# Altium PCB updated_pcb_file.PcbDoc (part 5 of 5)
Units mil, origin at the board's own origin, x right, y up, seen from the top; angles counter-clockwise.
Board outline 3385.83 x 2125.98 mil, 4 copper layers (L1 (TOP), L2 (GND), L3 (PWR), L4 (BOTTOM)), stack 38.228 mil thick; 154 components, 143 nets, 726 pads, 326 vias.
Unrouted connection lines stored in the file: 46.
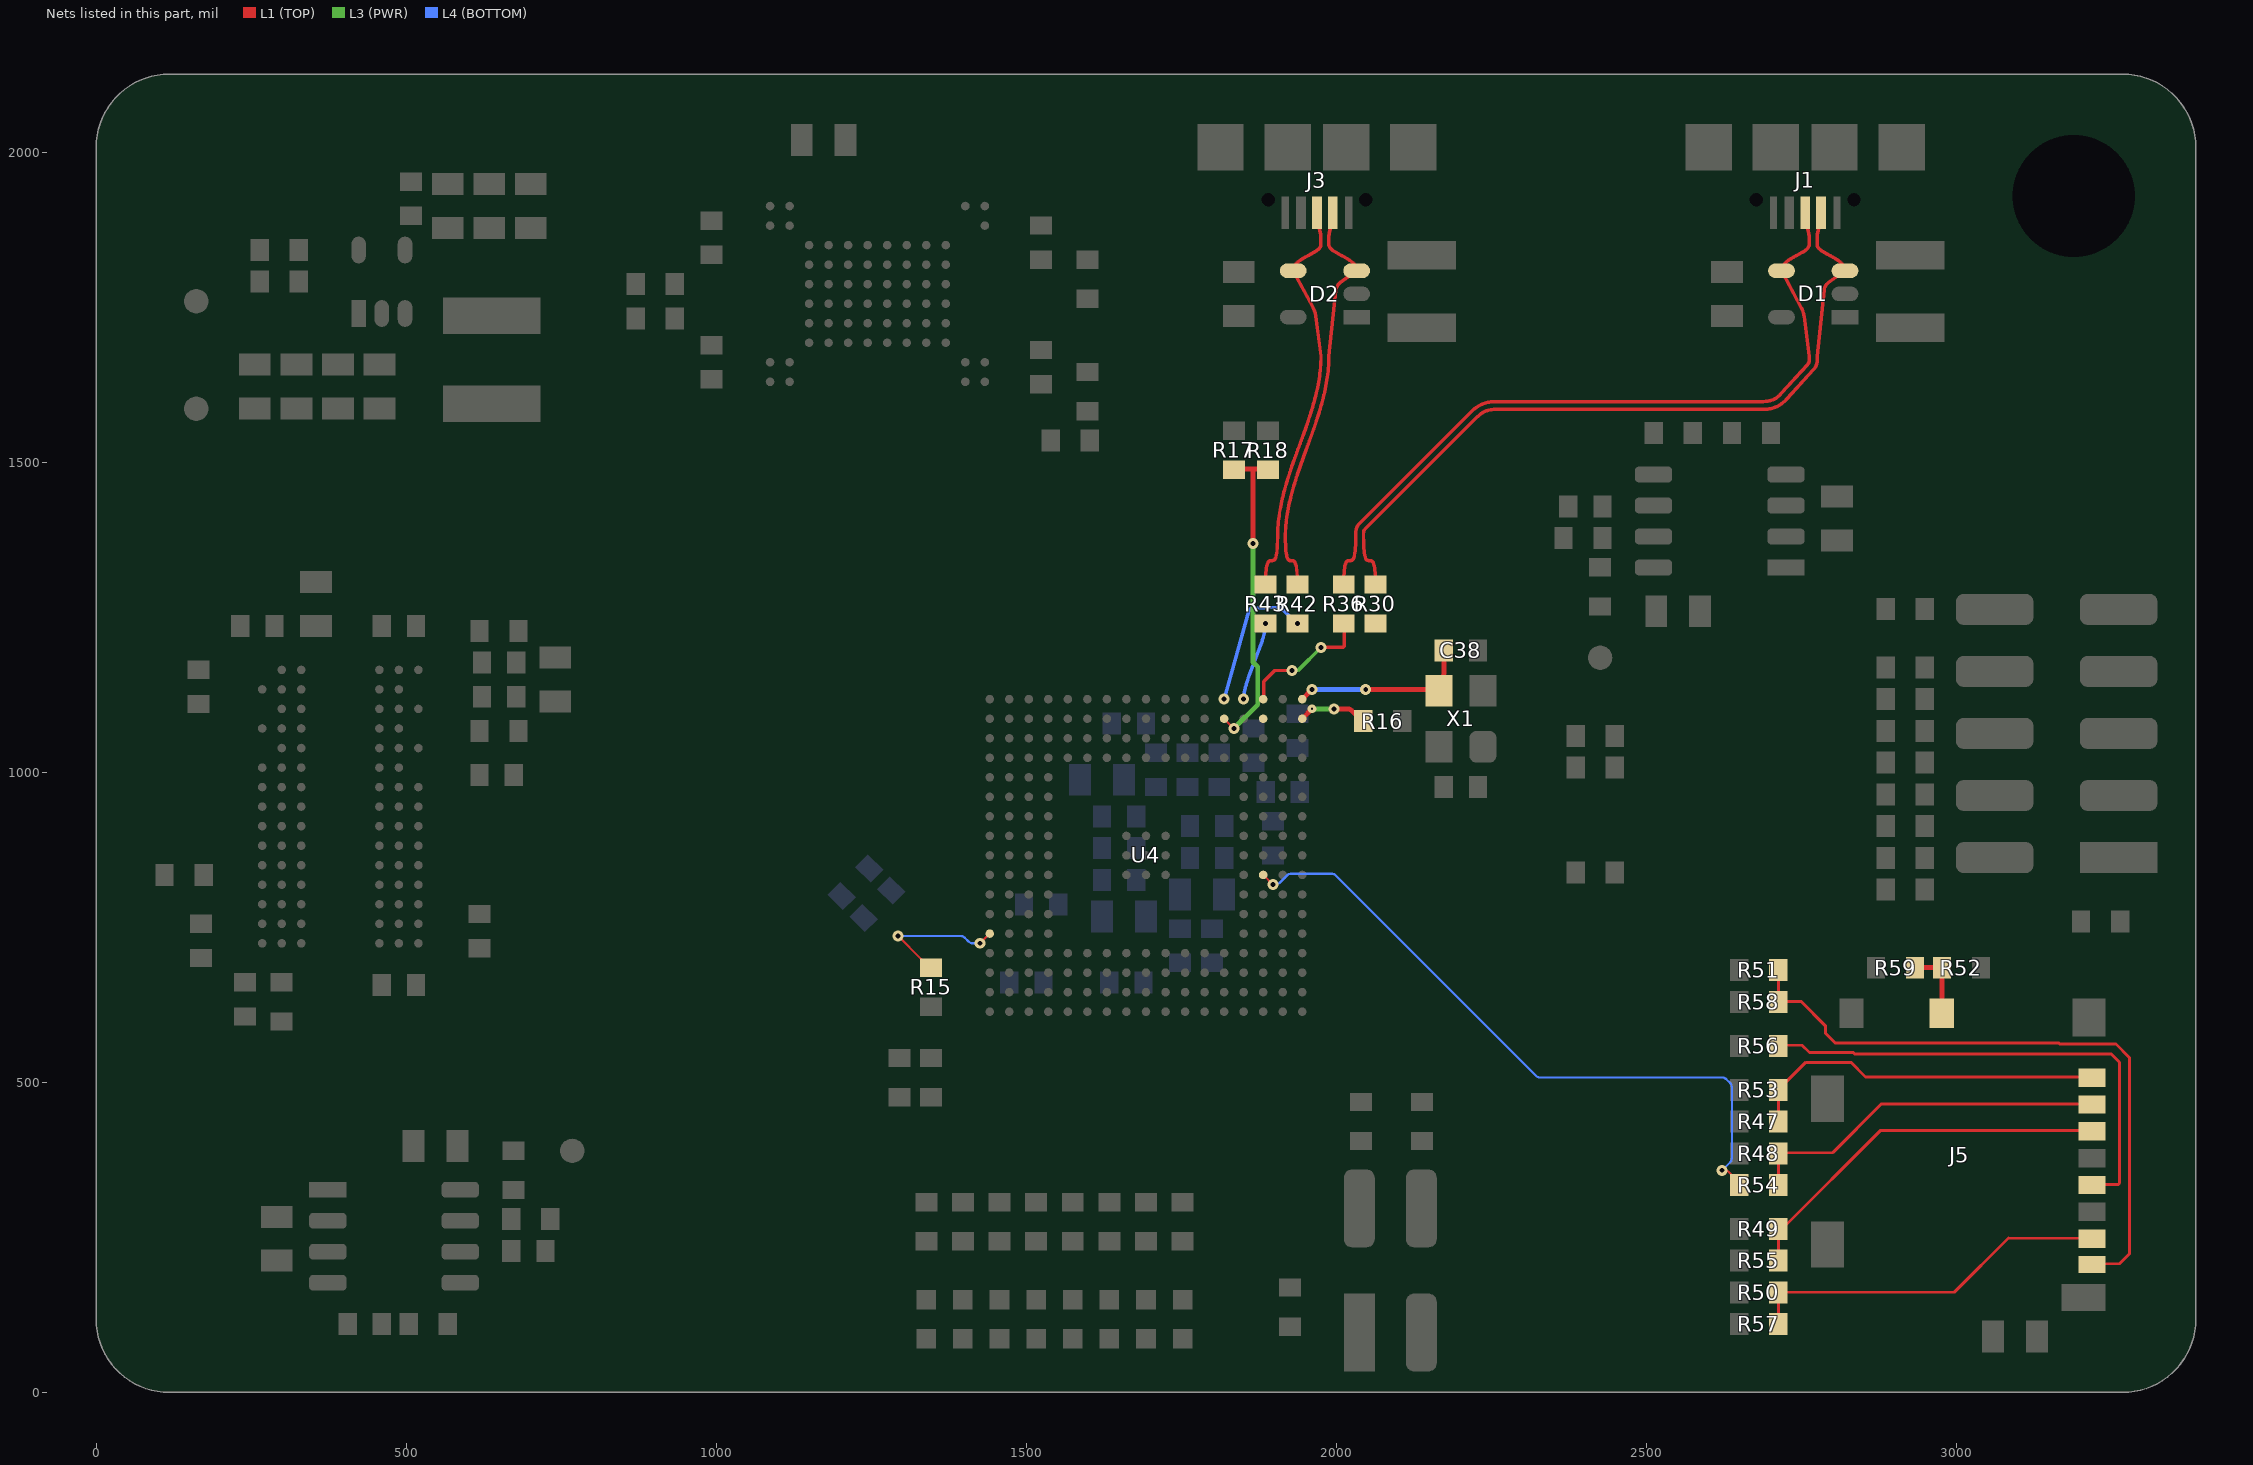
[diagram p7: the nets of this part, all layers, seen from the top]

## Via types
v1: diameter 17.72, hole 7.87, L1 (TOP) to L4 (BOTTOM), 310 vias
v2: diameter 13.78, hole 3.94, L1 (TOP) to L3 (PWR), 7 vias
v3: diameter 17.72, hole 7.87, L1 (TOP) to L3 (PWR), 5 vias
v4: diameter 13.78, hole 3.94, L2 (GND) to L4 (BOTTOM), 3 vias
v5: diameter 13.78, hole 3.94, L3 (PWR) to L4 (BOTTOM), 1 vias

## Nets (pads, with @x,y where several pads share a name; then routed paths per layer and width w, separated by ;. In a path a pad name is that pad's centre, name@x,y a point inside that pad or via, vN(x,y) a via of type N, cw(c..) or ccw(c..) an arc to the next point about the centre after c; other vN are vias at no path point) (continued)
SD_DAT3: R54.2 U4.R8 | length 1090.5
  L1 (TOP) w3.54: U4.R8@1881.89,834.65 v1(1897.64,818.9) ; v1(2622.05,358.27) 2625.98,358.27 cw(c2625.98,348.76) 2632.7,355.48 2635.83,352.36 R54.2@2649.6,334.65
  L4 (BOTTOM) w3.54: v1(1897.64,818.9) 1901.57,818.9 ccw(c1901.57,828.4) 1908.3,821.68 1920.35,833.73 cw(c1927.3,826.77) 1927.3,836.61 1991.99,836.61 cw(c1991.99,826.77) 1998.95,833.73 2321.92,510.76 ccw(c2328.88,517.72) 2328.88,507.87 2621.91,507.87 cw(c2621.91,498.03) 2628.87,504.99 2634.91,498.95 cw(c2627.95,491.99) 2637.79,491.99 2637.79,378.09 cw(c2627.95,378.09) 2634.91,371.13 v1(2622.05,358.27)
SD_R_CD: J5.9 R52.1 R59.1 | length 116.7
  L1 (TOP) w7.87: R59.1@2933.07,685.04 2976.38,685.04 J5.9@2976.28,611.61
SD_R_CLK: J5.5 R56.1 | length 802
  L1 (TOP) w4.72: R56.1@2712.6,559.06 2715.59,559.9 2751.03,559.9 2762.84,548.09 2833.7,548.09 2835.67,546.12 3249.06,546.12 3262.84,532.34 3262.84,337.46 3260.87,335.49 3221.5,335.49 J5.5@3218.41,334.65
SD_R_CMD: J5.3 R49.1 R55.1 | length 622.6
  L1 (TOP) w4.72: R55.1@2712.6,212.6 2712.6,263.78 2719.53,264.62 2877.01,422.1 3217.56,422.1 J5.3@3218.41,421.26
SD_R_DAT0: J5.7 R50.1 R57.1 | length 592.9
  L1 (TOP) w4.72: R57.1@2712.6,110.24 2712.6,161.42 2997.09,162.26 3083.7,248.87 J5.7@3218.41,248.03
SD_R_DAT1: J5.8 R51.1 R58.1 | length 1045.5
  L1 (TOP) w4.72: R51.1@2712.6,681.1 2712.6,629.92 2715.59,630.76 2749.06,630.76 2788.43,591.39 2788.43,579.58 2804.18,563.83 3164.41,563.83 3166.38,561.87 3256.93,561.87 3278.59,540.21 3278.59,223.28 3262.84,207.54 3221.5,207.54 J5.8@3218.41,206.69
SD_R_DAT2: J5.1 R47.1 R53.1 | length 585.4
  L1 (TOP) w4.72: R47.1@2712.6,437.01 2712.6,488.19 2756.93,532.34 2829.77,532.34 2853.39,508.72 3217.56,508.72 J5.1@3218.41,507.87
SD_R_DAT3: J5.2 R48.1 R54.1 | length 590
  L1 (TOP) w4.72: R54.1@2712.6,334.65 2712.6,385.83 2800.24,386.67 2878.98,465.41 3217.56,465.41 J5.2@3218.41,464.57
USB_D_N: D1.3 J1.2 R30.1 | length 1219.9
  L1 (TOP) w5.55: 2049.71,1342.13 cw(c2051.87,1345.91) 2048.91,1342.72 2048.86,1342.77 cw(c2052.63,1346.83) 2048.11,1343.62 2047.65,1344.26 2046.91,1345.78 2046.22,1347.76 2045.61,1350.26 2045.06,1353.34 2044.6,1357.08 2044.23,1361.52 2043.95,1366.74 2043.78,1372.79 2043.72,1379.73 2043.72,1383.94 2043.72,1385.9 2043.77,1387.49 2043.88,1388.13 cw(c2049.48,1387.26) 2044.13,1389.13 2044.3,1389.62 2044.83,1390.58 2045.61,1391.59 2046.78,1392.81 2048.2,1394.24 2226.49,1572.53 2227.86,1573.86 2229.32,1575.15 2230.81,1576.48 2232.11,1577.56 2233.6,1578.57 2235.19,1579.65 2236.62,1580.51 2238.28,1581.33 2239.92,1582.15 2241.46,1582.76 2243.31,1583.37 2244.95,1583.94 2246.59,1584.27 2248.58,1584.65 2250.25,1584.98 2251.95,1585.07 2254.03,1585.2 2255.94,1585.31 2257.86,1585.31 2686.56,1585.31 2688.8,1585.31 2691.1,1585.4 2693.26,1585.54 2695.67,1585.7 2698.16,1586.1 2700.34,1586.54 2702.8,1587.05 2705.22,1587.87 2707.31,1588.61 2709.7,1589.54 2711.9,1590.71 2713.92,1591.79 2716.09,1593.12 2718.01,1594.52 2719.9,1595.92 2721.81,1597.58 2723.45,1599.16 2725.05,1600.72 2726.63,1602.39 2769.08,1649.21 2770.7,1651.12 2772.34,1653.47 2773.7,1656.18 2774.64,1659.12 2775.1,1662.04 2775.22,1664.63 2775.22,1666.85 2775.22,1671.06 2786.49,1777.79 cw(c2796.28,1776.75) 2786.84,1779.54 2787.11,1780.45 2787.68,1782.19 2788.46,1783.82 2789.37,1785.36 2790.4,1786.85 2791.63,1788.2 2792.29,1788.89 cw(c2799.39,1782.07) 2793.64,1790.06 2820.08,1809.06 2819.94,1811.05 2819.54,1812.95 2818.9,1814.77 2818.03,1816.51 2816.95,1818.18 2815.68,1819.79 2814.24,1821.32 2812.65,1822.8 2810.92,1824.22 2809.07,1825.6 2807.12,1826.93 2805.1,1828.21 2803,1829.47 2800.87,1830.69 2798.7,1831.88 2796.53,1833.05 2794.36,1834.2 2792.23,1835.35 2790.13,1836.48 2788.1,1837.61 2786.16,1838.74 2784.31,1839.88 2782.58,1841.03 2780.98,1842.19 2779.54,1843.37 2778.27,1844.58 2777.19,1845.81 2776.32,1847.08 2775.67,1848.39 2775.47,1849.07 cw(c2782.57,1851.18) 2775.2,1850.45 2775.13,1851.15 2775.11,1860.5 2775.13,1861.9 2775.18,1863.25 2775.27,1864.56 2775.39,1865.83 2775.54,1867.06 2775.72,1868.27 2775.93,1869.45 2776.15,1870.61 2776.4,1871.76 2776.66,1872.89 2776.94,1874.02 2777.23,1875.15 2777.52,1876.28 2778.14,1878.58 2778.45,1879.75 2778.75,1880.94 2779.06,1882.16 2779.36,1883.41 2779.65,1884.7 2779.92,1886.02 2780.19,1887.4 2780.44,1888.82 2780.66,1890.3 2780.87,1891.83 2781.05,1893.43 2781.2,1895.1 2781.33,1896.84 2781.42,1898.67 2781.48,1900.57 J1.2@2781.5,1902.56 ; 2049.74,1342.11 ccw(c2051.89,1345.89) 2050.6,1341.74 2051.05,1341.6 2051.96,1341.48 2052.89,1341.44 2053.82,1341.44 2054.75,1341.41 2055.67,1341.28 2056.12,1341.14 cw(c2054.82,1336.99) 2056.97,1340.77 cw(c2054.84,1336.97) 2057.8,1340.16 2057.85,1340.12 cw(c2054.09,1336.05) 2058.6,1339.27 2059.06,1338.62 2059.8,1337.1 2060.49,1335.13 2061.11,1332.63 2061.65,1329.54 2062.11,1325.8 2062.49,1321.36 2062.76,1316.14 2062.93,1310.09 R30.1@2062.99,1303.15
USB_D_P: D1.4 J1.3 R36.1 | length 1212.7
  L1 (TOP) w5.55: R36.1@2011.81,1303.15 2011.87,1310.09 2012.04,1316.14 2012.32,1321.36 2012.69,1325.8 2013.15,1329.54 2013.7,1332.63 2014.32,1335.13 2015,1337.1 2015.74,1338.62 2016.2,1339.27 cw(c2020.72,1336.05) 2016.95,1340.12 2017,1340.16 cw(c2019.96,1336.97) 2017.8,1340.75 ; 2017.83,1340.77 cw(c2019.98,1336.99) 2018.69,1341.14 2019.14,1341.28 2020.05,1341.41 2020.98,1341.44 2021.91,1341.44 2022.84,1341.48 2023.76,1341.6 2024.21,1341.74 ccw(c2022.91,1345.89) 2025.06,1342.11 ; 2025.09,1342.13 ccw(c2022.93,1345.91) 2025.89,1342.72 2025.94,1342.77 ccw(c2022.18,1346.83) 2026.69,1343.62 2027.15,1344.26 2027.9,1345.78 2028.58,1347.76 2029.2,1350.26 2029.74,1353.34 2030.2,1357.08 2030.58,1361.52 2030.85,1366.74 2031.02,1372.79 2031.08,1379.73 2031.08,1383.94 2031.08,1386.17 2031.2,1388.79 2031.71,1391.77 2032.75,1394.75 2034.23,1397.47 2036,1399.79 2037.72,1401.63 2039.27,1403.17 2217.61,1581.51 2219.25,1583.11 2220.94,1584.61 2222.59,1586.07 2224.52,1587.67 2226.5,1589.02 2228.39,1590.3 2230.55,1591.6 2232.66,1592.65 2234.79,1593.7 2237.14,1594.63 2239.28,1595.35 2241.62,1596.13 2244.09,1596.66 2246.22,1597.07 2248.69,1597.52 2251.19,1597.69 2253.3,1597.81 2255.59,1597.94 2257.86,1597.94 2686.56,1597.94 2688.53,1597.94 2690.43,1598.02 2692.46,1598.15 2694.25,1598.26 2695.89,1598.53 2697.84,1598.93 2699.49,1599.25 2701.04,1599.79 2702.92,1600.46 2704.45,1601.04 2705.95,1601.85 2707.64,1602.75 2709.04,1603.61 2710.51,1604.7 2712,1605.79 2713.26,1606.89 2714.64,1608.23 2716.05,1609.6 2717.36,1610.98 2759.6,1657.57 2760.71,1658.85 2761.48,1659.94 2762,1660.98 2762.34,1662.04 2762.53,1663.26 2762.58,1664.88 2762.58,1666.85 2762.58,1671.06 2754.3,1735.44 2753.97,1737.36 2753.57,1739.27 2753.04,1741.13 2752.46,1742.98 2751.78,1744.79 2751,1746.57 2750.16,1748.33 2717.72,1809.06 2717.85,1811.05 2718.25,1812.95 2718.89,1814.77 2719.76,1816.51 2720.84,1818.18 2722.1,1819.78 2723.54,1821.32 2725.13,1822.8 2726.85,1824.22 2728.69,1825.59 2730.64,1826.92 2732.66,1828.2 2734.74,1829.46 2736.87,1830.67 2739.03,1831.87 2741.2,1833.04 2743.36,1834.19 2745.49,1835.33 2747.57,1836.46 2749.59,1837.59 2751.53,1838.72 2753.37,1839.86 2755.1,1841 2756.69,1842.17 2758.12,1843.35 2759.38,1844.55 2760.46,1845.79 2761.32,1847.06 2761.96,1848.37 2762.16,1849.04 ccw(c2755.06,1851.12) 2762.42,1850.42 2762.49,1851.12 2762.47,1860.47 2762.45,1861.87 2762.39,1863.22 2762.29,1864.53 2762.16,1865.8 2762,1867.04 2761.82,1868.24 2761.61,1869.43 2761.37,1870.59 2761.12,1871.74 2760.85,1872.87 2760.56,1874.01 2760.27,1875.14 2759.96,1876.27 2759.34,1878.56 2759.02,1879.74 2758.7,1880.93 2758.39,1882.15 2758.09,1883.4 2757.79,1884.69 2757.51,1886.02 2757.24,1887.39 2756.99,1888.81 2756.76,1890.29 2756.55,1891.83 2756.36,1893.43 2756.2,1895.1 2756.08,1896.84 2755.98,1898.66 2755.93,1900.57 J1.3@2755.91,1902.56
USB_H_N: D2.3 J3.2 R42.1 | length 657.5
  L1 (TOP) w5.55: R42.1@1937.01,1303.15 1936.95,1310.1 1936.78,1316.15 1936.5,1321.37 1936.13,1325.82 1935.67,1329.55 1935.12,1332.64 1934.5,1335.14 1933.82,1337.11 1933.08,1338.62 1932.62,1339.27 ccw(c1928.15,1336.08) 1931.87,1340.11 1931.82,1340.16 ccw(c1928.9,1336.99) 1931.02,1340.74 ccw(c1928.87,1337) 1930.13,1341.13 1929.68,1341.26 1928.77,1341.38 1927.84,1341.41 1926.91,1341.4 1925.98,1341.43 1925.06,1341.55 1924.61,1341.69 cw(c1925.87,1345.81) 1923.76,1342.05 cw(c1925.84,1345.82) 1922.93,1342.65 1922.88,1342.7 cw(c1926.59,1346.73) 1922.13,1343.54 1921.67,1344.19 1920.92,1345.7 1920.24,1347.68 1919.62,1350.17 1919.08,1353.26 1918.62,1357 1918.24,1361.44 1917.97,1366.66 1917.8,1372.71 1917.74,1379.66 1917.79,1384.34 1917.94,1388.95 1918.19,1393.54 1918.53,1398.13 1918.96,1402.71 1919.48,1407.29 1920.08,1411.86 1920.76,1416.42 1921.52,1420.99 1922.36,1425.54 1923.27,1430.1 1924.25,1434.65 1925.29,1439.19 1926.39,1443.74 1927.56,1448.28 1928.78,1452.82 1930.05,1457.36 1931.37,1461.9 1932.74,1466.44 1934.15,1470.97 1935.6,1475.51 1937.08,1480.05 1938.6,1484.58 1940.15,1489.12 1941.73,1493.66 1943.33,1498.2 1944.95,1502.75 1946.58,1507.29 1948.23,1511.84 1949.89,1516.39 1951.56,1520.94 1953.23,1525.5 1954.89,1530.06 1956.56,1534.63 1958.22,1539.2 1959.86,1543.78 1961.5,1548.36 1963.11,1552.95 1964.71,1557.55 1966.28,1562.16 1967.83,1566.77 1969.34,1571.39 1970.82,1576.01 1972.26,1580.65 1973.66,1585.3 1975.02,1589.95 1976.33,1594.62 1977.58,1599.3 1978.78,1603.99 1979.93,1608.69 1981.01,1613.4 1982.02,1618.13 1982.97,1622.87 1983.84,1627.62 1984.63,1632.39 1985.35,1637.17 1985.98,1641.96 1986.53,1646.77 1986.98,1651.6 1987.34,1656.44 1987.6,1661.29 1987.76,1666.17 1987.81,1670.99 1998.95,1776.69 1999.23,1778.6 1999.72,1780.4 2000.33,1782.12 2001.07,1783.77 2002.02,1785.3 2003.01,1786.8 2004.26,1788.15 2004.9,1788.82 cw(c2012.03,1782.04) 2006.28,1790.03 2032.68,1809.06 2032.54,1811.05 2032.14,1812.95 2031.5,1814.77 2030.63,1816.51 2029.55,1818.18 2028.28,1819.79 2026.84,1821.32 2025.25,1822.8 2023.52,1824.22 2021.67,1825.6 2019.72,1826.93 2017.69,1828.21 2015.6,1829.47 2013.46,1830.69 2011.3,1831.88 2009.13,1833.05 2006.96,1834.2 2004.82,1835.35 2002.73,1836.48 2000.7,1837.61 1998.76,1838.74 1996.91,1839.88 1995.18,1841.03 1993.58,1842.19 1992.14,1843.37 1990.87,1844.58 1989.79,1845.81 1988.92,1847.08 1988.27,1848.39 1988.07,1849.07 cw(c1995.17,1851.18) 1987.8,1850.45 1987.73,1851.15 1987.71,1860.5 1987.72,1861.9 1987.78,1863.25 1987.87,1864.56 1987.99,1865.83 1988.14,1867.06 1988.32,1868.27 1988.52,1869.45 1988.75,1870.61 1989,1871.76 1989.26,1872.89 1989.54,1874.02 1989.82,1875.15 1990.12,1876.28 1990.73,1878.58 1991.04,1879.75 1991.35,1880.94 1991.66,1882.16 1991.96,1883.41 1992.25,1884.7 1992.52,1886.02 1992.79,1887.4 1993.03,1888.82 1993.26,1890.3 1993.47,1891.83 1993.65,1893.43 1993.8,1895.1 1993.93,1896.84 1994.02,1898.67 1994.08,1900.57 J3.2@1994.09,1902.56
USB_H_P: D2.4 J3.3 R43.1 | length 650.4
  L1 (TOP) w5.55: R43.1@1885.83,1303.15 1885.89,1310.1 1886.06,1316.15 1886.33,1321.37 1886.71,1325.82 1887.17,1329.56 1887.71,1332.65 1888.33,1335.16 1889.02,1337.13 1889.76,1338.65 1890.22,1339.3 cw(c1894.74,1336.08) 1890.97,1340.15 1891.02,1340.2 cw(c1893.98,1337) 1891.82,1340.79 ; 1891.85,1340.8 cw(c1894,1337.03) 1892.7,1341.17 1893.15,1341.32 1894.07,1341.44 1895,1341.47 1895.93,1341.48 1896.86,1341.51 1897.77,1341.64 1898.22,1341.78 ccw(c1896.93,1345.92) 1899.08,1342.15 ccw(c1896.95,1345.95) 1899.91,1342.75 1899.96,1342.8 ccw(c1896.19,1346.87) 1900.71,1343.65 1901.17,1344.3 1901.91,1345.82 1902.6,1347.8 1903.21,1350.3 1903.76,1353.39 1904.22,1357.13 1904.59,1361.58 1904.87,1366.8 1905.04,1372.85 1905.1,1379.8 1905.15,1384.62 1905.31,1389.49 1905.57,1394.35 1905.93,1399.19 1906.39,1404.02 1906.93,1408.83 1907.56,1413.62 1908.28,1418.4 1909.08,1423.17 1909.95,1427.92 1910.89,1432.66 1911.91,1437.38 1912.99,1442.1 1914.13,1446.8 1915.33,1451.49 1916.59,1456.17 1917.9,1460.83 1919.25,1465.49 1920.65,1470.14 1922.09,1474.77 1923.57,1479.4 1925.09,1484.02 1926.63,1488.63 1928.2,1493.24 1929.8,1497.83 1931.42,1502.42 1933.05,1507.01 1934.7,1511.58 1936.36,1516.16 1938.02,1520.72 1939.69,1525.29 1941.36,1529.84 1943.02,1534.4 1944.68,1538.95 1946.33,1543.5 1947.97,1548.04 1949.58,1552.59 1951.18,1557.13 1952.76,1561.67 1954.31,1566.2 1955.83,1570.74 1957.32,1575.28 1958.77,1579.81 1960.18,1584.35 1961.54,1588.89 1962.87,1593.43 1964.14,1597.97 1965.36,1602.51 1966.52,1607.05 1967.63,1611.59 1968.67,1616.14 1969.65,1620.69 1970.55,1625.24 1971.39,1629.8 1972.15,1634.36 1972.84,1638.93 1973.44,1643.5 1973.96,1648.08 1974.39,1652.66 1974.73,1657.25 1974.98,1661.84 1975.13,1666.44 1975.18,1671.13 1966.93,1735.49 1966.64,1737.43 1966.23,1739.33 1965.74,1741.2 1965.15,1743.04 1964.46,1744.85 1963.69,1746.64 1962.81,1748.38 1930.32,1809.06 1930.45,1811.05 1930.85,1812.95 1931.49,1814.77 1932.36,1816.51 1933.44,1818.18 1934.7,1819.78 1936.14,1821.32 1937.73,1822.8 1939.45,1824.22 1941.29,1825.59 1943.23,1826.92 1945.26,1828.2 1947.34,1829.46 1949.47,1830.67 1951.63,1831.87 1953.8,1833.04 1955.95,1834.19 1958.08,1835.33 1960.17,1836.46 1962.19,1837.59 1964.13,1838.72 1965.97,1839.86 1967.7,1841 1969.28,1842.17 1970.72,1843.35 1971.98,1844.55 1973.05,1845.79 1973.92,1847.06 1974.56,1848.37 1974.76,1849.04 ccw(c1967.66,1851.12) 1975.02,1850.42 1975.09,1851.12 1975.07,1860.47 1975.05,1861.87 1974.99,1863.22 1974.89,1864.53 1974.76,1865.8 1974.6,1867.04 1974.41,1868.24 1974.2,1869.43 1973.97,1870.59 1973.72,1871.74 1973.45,1872.87 1973.16,1874.01 1972.87,1875.14 1972.56,1876.27 1971.93,1878.56 1971.62,1879.74 1971.3,1880.93 1970.99,1882.15 1970.69,1883.4 1970.39,1884.69 1970.11,1886.02 1969.84,1887.39 1969.59,1888.81 1969.35,1890.29 1969.14,1891.83 1968.96,1893.43 1968.8,1895.1 1968.68,1896.84 1968.58,1898.66 1968.52,1900.57 J3.3@1968.5,1902.56
USBD_N: R30.2 U4.R16
USBD_P: R36.2 U4.R17 | length 219.1
  L1 (TOP) w5.55: U4.R17@1881.89,1118.11 1882.92,1120.92 1882.92,1146.51 1900.63,1164.23 v1(1928.19,1164.23) ; v1(1975.44,1201.63) 2010.87,1201.63 2012.84,1203.6 2012.84,1239.03 R36.2@2011.81,1240.16
  L3 (PWR) w5.55: v1(1928.19,1164.23) 1938.04,1164.23 v1(1975.44,1201.63)
USBH_N: R42.2 U4.N17 | length 237.7
  L4 (BOTTOM) w5.55: v1(1818.9,1118.11) 1858.57,1259.55 cw(c1864.85,1257.78) 1859.19,1261.04 1859.6,1261.74 1860.09,1262.36 cw(c1863.65,1259.48) 1861.21,1263.35 1861.86,1263.76 1862.51,1264.15 cw(c1864.03,1261.63) 1863.92,1264.57 1906.13,1266.2 1907.07,1266.14 cw(c1906.71,1260.73) 1908.73,1265.76 cw(c1906.5,1260.2) 1910.21,1264.9 1910.96,1264.31 v1(1937.01,1240.16)
USBH_P: R43.2 U4.P17 | length 127.7
  L4 (BOTTOM) w5.55: v1(1850.39,1118.11) 1850.42,1119.64 1850.5,1121.22 1850.63,1122.83 1850.8,1124.47 1851.03,1126.15 1851.3,1127.87 1851.61,1129.62 1851.96,1131.4 1852.36,1133.21 1852.79,1135.05 1853.26,1136.91 1853.76,1138.81 1854.3,1140.72 1854.87,1142.67 1855.46,1144.63 1856.09,1146.61 1856.74,1148.62 1857.42,1150.64 1858.12,1152.68 1858.84,1154.74 1859.58,1156.81 1860.34,1158.9 1861.11,1161 1861.9,1163.1 1862.7,1165.22 1863.52,1167.35 1864.34,1169.48 1865.17,1171.62 1866.01,1173.76 1866.85,1175.91 1869.38,1182.36 1870.22,1184.5 1871.05,1186.65 1871.88,1188.79 1872.7,1190.92 1873.52,1193.05 1874.32,1195.16 1875.11,1197.27 1875.88,1199.37 1876.64,1201.46 1877.38,1203.53 1878.1,1205.58 1878.8,1207.63 1879.48,1209.65 1880.13,1211.65 1880.76,1213.64 1881.36,1215.6 1881.92,1217.54 1882.46,1219.46 1882.96,1221.36 1883.43,1223.22 1883.86,1225.06 1884.26,1226.87 1884.61,1228.65 1884.92,1230.4 1885.19,1232.11 1885.42,1233.8 1885.59,1235.44 1885.72,1237.05 1885.8,1238.62 v1(1885.83,1240.16)
VDDFUSE: R17.1 R18.2 U4.N16 | length 513.9
  L1 (TOP) w3.54: U4.N16@1818.9,1086.61 v3(1834.65,1070.87)
  L1 (TOP) w7.87: R17.1@1834.65,1488.19 1837.64,1489.03 1888.82,1489.03 R18.2@1889.76,1488.19 ; v1(1865.2,1368.95) 1865.2,1489.03
  L3 (PWR) w7.87: v3@1835.67,1071.71 1873.07,1109.11 1873.07,1170.13 1865.2,1178.01 v1(1865.2,1368.95)
WKUP: R15.2 U4.A5 | length 232
  L1 (TOP) w3.54: v1(1293.31,736.22) 1330.71,698.82 R15.2@1346.46,685.04 ; v1(1425.2,724.41) U4.A5@1440.94,740.16
  L4 (BOTTOM) w3.54: v1(1293.31,736.22) 1393.56,736.22 cw(c1393.56,726.38) 1400.52,733.34 1406.57,727.29 ccw(c1413.53,734.25) 1413.53,724.41 v1(1425.2,724.41)
XIN: C38.2 U4.U17 X1.3 | length 293.2
  L1 (TOP) w7.87: U4.U17@1944.88,1118.11 v1(1960.63,1133.86) ; v1(2047.24,1133.86) 2145.67,1133.86 2165.35,1131.89 2172.79,1156.07 ccw(c2163.38,1158.96) 2173.23,1158.96 2173.23,1181.1 C38.2@2173.23,1196.85
  L4 (BOTTOM) w7.87: v1(1960.63,1133.86) v1(2047.24,1133.86)
XOUT: R16.2 U4.U16 | length 112.2
  L1 (TOP) w7.87: U4.U16@1944.88,1086.61 v2(1960.63,1102.36) ; v1(1996.06,1102.36) 2017.58,1102.36 cw(c2017.58,1092.52) 2024.54,1099.48 2029.53,1094.49 R16.2@2043.31,1082.68
  L3 (PWR) w7.87: v2(1960.63,1102.36) v1(1996.06,1102.36)
pads on no net: D1.1 D2.1 J1.4 J1.MH1 J1.MH2 J2.7 J3.4 J3.MH1 J3.MH2 U4.A1 U4.A3 U4.A4 U4.A6 U4.B1 U4.B5 U4.B7 U4.B16 U4.C1 U4.C2 U4.C3 U4.C6 U4.C7 U4.C17 U4.D1 U4.D2 U4.D3 U4.D4 U4.D7 U4.D14 U4.D17 U4.E1 U4.E2 U4.E3 U4.E4 U4.E17 U4.F1 U4.F2 U4.F3 U4.F4 U4.F17 U4.G1 U4.G2 U4.G3 U4.G4 U4.G16 U4.G17 U4.H1 U4.H2 U4.H3 U4.H4 U4.H15 U4.H16 U4.H17 U4.J1 U4.J3 U4.J15 U4.K1 U4.K3 U4.K4 U4.L1 U4.L2 U4.M1 U4.M2 U4.M3 U4.M4 U4.N4 U4.N15 U4.P4 U4.P5 U4.R1 U4.R2 U4.R3 U4.R9 U4.R10 U4.T1 U4.T2 U4.T3 U4.T4 U4.T5 U4.T6 U4.T9 U4.T10 U4.T11 U4.T12 U4.T14 U4.U1 U4.U2 U4.U3 U4.U4 U4.U5 U4.U6 U4.U7 U4.U9 U4.U10 U4.U11 U4.U12 U4.U13 U5.A2 U5.E2 U5.R3 U5.R7 U6.A1 U6.A2 U6.A9 U6.A10 U6.B1 U6.B9 U6.B10 U6.D6 U6.D7 U6.D8 U6.E3 U6.E4 U6.E5 U6.E6 U6.E7 U6.E8 U6.F3 U6.F4 U6.F5 U6.F6 U6.F8 U6.G3 U6.G5 U6.G6 U6.G7 U6.G8 U6.H3 U6.H5 U6.H6 U6.H7 U6.J3 U6.J5 U6.L1 U6.L2 U6.L9 U6.L10 U6.M1 U6.M2 U6.M9 U6.M10

## Polygon pours and split planes (outlines as drawn)
GND on L1 (TOP) "GND" (solid, remove dead copper, pour order 0): 345.27,1697.3 345.55,1697.31 345.59,1697.32 345.63,1697.33 345.66,1697.34 345.7,1697.36 345.73,1697.38 345.76,1697.4 345.96,1697.59 347.04,1698.66 347.76,1699.38 348.57,1700.19 349.73,1701.35 351.7,1703.32 353.36,1704.98 353.67,1705.29 354.38,1706 355.64,1707.26 356.37,1707.99 357.61,1709.23 358.99,1710.61 359.57,1711.19 361.54,1713.16 362.81,1714.43 363.51,1715.13 365.11,1716.73 365.48,1717.1 365.69,1717.31 367.45,1719.07 369.41,1721.03 371.38,1723 372.26,1723.88 373.35,1724.97 375.32,1726.94 379.26,1730.88 380.52,1732.15 381.23,1732.85 381.36,1732.98 383.68,1734.7 388.72,1737.39 390.19,1738.03 391.75,1738.42 393.36,1738.55 397.2,1738.55 399.12,1738.36 400.96,1737.8 404.51,1736.33 406.21,1735.42 407.7,1734.2 410.42,1731.49 411.64,1729.99 412.55,1728.29 414.02,1724.74 414.69,1722.26 414.72,1722.05 430.45,1722.05 433.19,1721.66 438.46,1720.13 440.58,1719.23 442.44,1717.86 445.13,1715.35 446.29,1714.04 447.21,1712.56 450.94,1705.08 451.03,1704.9 451.61,1703.66 457.31,1695.57 463.24,1689.64 470,1684.79 470.62,1684.65 470.87,1684.65 471.15,1684.64 478.74,1684.42 481.53,1683.93 483.51,1683.28 485.2,1682.54 486.73,1681.5 491.27,1677.72 491.63,1677.39 492.4,1677.03 494.24,1676.58 495.66,1676.04 497.71,1674.95 500.83,1672.8 502.28,1671.58 503.47,1670.1 505.54,1666.93 506.42,1665.25 506.96,1663.43 507.69,1659.72 507.87,1657.72 507.64,1637.06 507.49,1635.43 507.07,1633.85 505.19,1628.61 504.49,1627.07 503.53,1625.68 500.24,1621.67 499.06,1620.46 497.69,1619.47 492.91,1616.61 491.37,1615.86 489.71,1615.39 484.38,1614.36 482.52,1614.19 227.71,1614.4 226.18,1614.53 224.69,1614.88 220.3,1616.3 218.96,1616.85 217.71,1617.59 213.92,1620.22 212.8,1621.13 211.82,1622.2 208.95,1625.82 208.14,1627.02 207.51,1628.33 205.83,1632.62 205.33,1634.34 205.15,1636.12 204.73,1674.84 204.79,1676.06 205.23,1679.94 205.72,1682.09 206.81,1685.18 207.63,1686.94 208.78,1688.5 212.41,1692.54 213.75,1693.78 215.31,1694.75 217.01,1695.42 222.23,1696.92 224.95,1697.3
GND on L1 (TOP) "GND" (solid, remove dead copper, pour order 1): 153 vertices, not listed, extent 434.2,1788.53 751.97,1993.11
NetL1_1 on L1 (TOP) "NetL1_1" (solid, remove dead copper, pour order 3): 476.77,1813.45 477.36,1813.63 483.26,1815.26 484.67,1815.54 494.96,1816.81 496.63,1816.87 505.84,1816.43 507.53,1816.21 517.78,1813.9 519.51,1813.34 523.02,1811.83 524.69,1810.91 526.15,1809.69 526.62,1809.1 527.3,1809.1 528.97,1808.93 528.97,1809.1 529.16,1811.02 529.72,1812.87 530.63,1814.57 531.85,1816.06 533.34,1817.28 535.05,1818.19 536.89,1818.75 538.81,1818.94 735.66,1818.94 737.58,1818.75 739.43,1818.19 741.13,1817.28 742.62,1816.06 743.85,1814.57 744.76,1812.87 745.32,1811.02 745.51,1809.1 765.19,1809.1 767.11,1808.91 768.96,1808.35 770.66,1807.44 772.15,1806.22 773.37,1804.73 774.28,1803.02 774.84,1801.18 775.03,1799.26 775.03,1671.31 774.84,1669.38 774.28,1667.54 773.37,1665.84 772.15,1664.35 770.66,1663.12 768.96,1662.21 767.11,1661.65 765.19,1661.46 745.51,1661.46 745.32,1659.54 744.76,1657.7 743.85,1655.99 742.62,1654.5 741.13,1653.28 739.43,1652.37 737.58,1651.81 735.66,1651.62 538.81,1651.62 536.89,1651.81 535.05,1652.37 533.34,1653.28 531.85,1654.5 530.63,1655.99 529.72,1657.7 529.16,1659.54 528.97,1661.46 504.33,1661.46 502.41,1661.65 500.56,1662.21 498.86,1663.12 498.47,1663.44 494.03,1663.53 493.17,1663.58 490.15,1663.91 488.56,1664.21 487.04,1664.77 485.44,1665.52 483.84,1666.46 482.44,1667.68 481.3,1669.15 480.45,1670.8 480.31,1671.31 470.01,1671.31 467.69,1671.58 466.19,1671.95 464.41,1672.56 462.78,1673.51 455.21,1678.93 454,1679.95 453.14,1680.81 451.9,1682.3 450.99,1684.01 450.42,1685.86 450.23,1687.79 450.23,1710.68 450.42,1712.6 450.98,1714.44 451.89,1716.14 453.11,1717.63 454.6,1718.86 456.31,1719.77 458.15,1720.33 460.07,1720.52 469.91,1720.52 469.91,1804.07 470.12,1806.08 470.74,1808.02 471.74,1809.78 473.09,1811.3 474.71,1812.52 476.55,1813.37
NetL1_1 on L1 (TOP) "NetL1_1" (solid, remove dead copper, pour order 4): 450.23,1759.89 448.31,1760.08 446.46,1760.64 444.76,1761.55 443.27,1762.77 442.05,1764.26 441.14,1765.96 440.58,1767.81 440.39,1769.73 440.39,1781.03 440.55,1782.82 441.04,1784.56 441.84,1786.18 442.89,1787.88 443.52,1788.78 447.16,1793.46 447.91,1794.31 449.89,1796.32 451.39,1797.57 453.1,1798.49 454.97,1799.06 456.91,1799.26 469.91,1799.26 469.91,1804.07 470.12,1806.08 470.74,1808.02 471.74,1809.78 473.09,1811.3 474.71,1812.52 476.55,1813.37 476.77,1813.45 477.36,1813.63 483.26,1815.26 484.67,1815.54 494.96,1816.81 496.63,1816.87 505.84,1816.43 507.53,1816.21 517.78,1813.9 519.51,1813.34 523.02,1811.83 524.69,1810.91 526.15,1809.69 526.62,1809.1 527.3,1809.1 528.97,1808.93 528.97,1809.1 529.16,1811.02 529.72,1812.87 530.63,1814.57 531.85,1816.06 533.34,1817.28 535.05,1818.19 536.89,1818.75 538.81,1818.94 735.66,1818.94 737.58,1818.75 739.43,1818.19 741.13,1817.28 742.62,1816.06 743.85,1814.57 744.76,1812.87 745.32,1811.02 745.51,1809.1 765.19,1809.1 767.11,1808.91 768.96,1808.35 770.66,1807.44 772.15,1806.22 773.37,1804.73 774.28,1803.02 774.84,1801.18 775.03,1799.26 775.03,1671.31 774.84,1669.38 774.28,1667.54 773.37,1665.84 772.15,1664.35 770.66,1663.12 768.96,1662.21 767.11,1661.65 765.19,1661.46 745.51,1661.46 745.32,1659.54 744.76,1657.7 743.85,1655.99 742.62,1654.5 741.13,1653.28 739.43,1652.37 737.58,1651.81 735.66,1651.62 538.81,1651.62 536.89,1651.81 535.05,1652.37 533.34,1653.28 531.85,1654.5 530.63,1655.99 529.72,1657.7 529.16,1659.54 528.97,1661.46 504.33,1661.46 502.41,1661.65 500.56,1662.21 498.86,1663.12 498.47,1663.44 494.03,1663.53 493.17,1663.58 490.15,1663.91 488.56,1664.21 487.04,1664.77 485.44,1665.52 483.84,1666.46 482.44,1667.68 481.3,1669.15 480.45,1670.8 480.31,1671.31 470.01,1671.31 467.69,1671.58 466.19,1671.95 464.41,1672.56 462.78,1673.51 455.21,1678.93 454,1679.95 453.14,1680.81 451.9,1682.3 450.99,1684.01 450.42,1685.86 450.23,1687.79 450.23,1710.68 450.42,1712.6 450.98,1714.44 451.89,1716.14 453.11,1717.63 454.6,1718.86 456.31,1719.77 458.15,1720.33 460.07,1720.52 469.91,1720.52 469.91,1759.89
GND on L1 (TOP) "GND" (solid, remove dead copper, pour order 5): 250,177.95 248.08,178.14 246.23,178.7 244.53,179.61 243.04,180.84 241.82,182.33 240.91,184.03 240.35,185.88 240.16,187.8 240.16,237.01 240.35,238.93 240.91,240.78 241.82,242.48 243.04,243.97 244.53,245.19 246.23,246.1 248.08,246.66 250,246.85 259.84,246.85 259.84,424.02 260.03,425.94 260.59,427.78 261.5,429.48 262.73,430.98 264.22,432.2 265.92,433.11 267.77,433.67 269.69,433.86 486.22,433.86 486.22,443.7 486.41,445.62 486.97,447.47 487.88,449.17 489.1,450.66 490.6,451.89 492.3,452.8 494.14,453.36 496.06,453.54 545.28,453.54 547.2,453.36 549.04,452.8 550.74,451.89 552.24,450.66 553.46,449.17 554.37,447.47 554.93,445.62 555.12,443.7 555.12,355.12 554.93,353.2 554.37,351.35 553.46,349.65 552.24,348.16 550.74,346.94 549.04,346.03 547.2,345.47 545.28,345.28 535.43,345.28 535.43,158.27 535.24,156.35 534.68,154.5 533.77,152.8 532.55,151.31 531.06,150.09 529.36,149.18 527.51,148.62 525.59,148.43 417.32,148.43 417.13,146.51 416.57,144.66 415.66,142.96 414.44,141.47 412.95,140.24 411.25,139.33 409.4,138.77 407.48,138.58 328.74,138.58 326.82,138.77 324.97,139.33 323.27,140.24 321.78,141.47 320.56,142.96 319.65,144.66 319.09,146.51 318.9,148.43 269.69,148.43 267.77,148.62 265.92,149.18 264.22,150.09 262.73,151.31 261.5,152.8 260.59,154.5 260.03,156.35 259.84,158.27 259.84,177.95
GND on L1 (TOP) "GND" (solid, remove dead copper, pour order 6): 2651.58,1503.94 2651.76,1505.86 2652.32,1507.7 2653.23,1509.41 2654.46,1510.9 2655.95,1512.12 2657.65,1513.03 2659.5,1513.59 2661.42,1513.78 2779.53,1513.78 2781.45,1513.59 2783.29,1513.03 2785,1512.12 2786.49,1510.9 2787.71,1509.41 2788.62,1507.7 2789.18,1505.86 2789.37,1503.94 2828.74,1503.94 2830.66,1503.75 2832.51,1503.19 2834.21,1502.28 2835.7,1501.05 2836.92,1499.56 2837.83,1497.86 2838.39,1496.01 2838.58,1494.09 2838.58,1484.25 2848.43,1484.25 2850.35,1484.06 2852.19,1483.5 2853.89,1482.59 2855.39,1481.37 2856.61,1479.88 2857.52,1478.18 2858.08,1476.33 2858.27,1474.41 2858.27,1415.35 2858.08,1413.43 2857.52,1411.59 2856.61,1409.89 2855.39,1408.39 2853.89,1407.17 2852.19,1406.26 2850.35,1405.7 2848.43,1405.51 2838.58,1405.51 2838.58,1218.5 2838.39,1216.58 2837.83,1214.74 2836.92,1213.04 2835.7,1211.54 2834.21,1210.32 2832.51,1209.41 2830.66,1208.85 2828.74,1208.66 2553.15,1208.66 2551.23,1208.85 2549.38,1209.41 2547.68,1210.32 2546.19,1211.54 2544.97,1213.04 2544.06,1214.74 2543.5,1216.58 2543.31,1218.5 2543.31,1297.24 2543.5,1299.16 2544.06,1301.01 2544.97,1302.71 2546.19,1304.2 2547.68,1305.43 2549.38,1306.34 2551.23,1306.9 2553.15,1307.09 2562.99,1307.09 2562.99,1494.09 2563.18,1496.01 2563.74,1497.86 2564.65,1499.56 2565.88,1501.05 2567.37,1502.28 2569.07,1503.19 2570.91,1503.75 2572.83,1503.94
GND on L1 (TOP) "GND" (solid, remove dead copper, pour order 8): 1759.89,1939.3 1757.97,1939.49 1756.13,1940.05 1754.43,1940.96 1752.94,1942.19 1751.71,1943.68 1750.8,1945.38 1750.24,1947.23 1750.05,1949.15 1750.05,2057.41 1750.24,2059.33 1750.8,2061.18 1751.71,2062.88 1752.94,2064.37 1754.43,2065.6 1756.13,2066.51 1757.97,2067.07 1759.89,2067.26 2173.28,2067.26 2175.2,2067.07 2177.05,2066.51 2178.75,2065.6 2180.24,2064.37 2181.46,2062.88 2182.37,2061.18 2182.93,2059.33 2183.12,2057.41 2183.12,1949.15 2182.93,1947.23 2182.37,1945.38 2181.46,1943.68 2180.24,1942.19 2178.75,1940.96 2177.05,1940.05 2175.2,1939.49 2173.28,1939.3 2173.28,1762.14 2173.09,1760.22 2172.53,1758.37 2171.62,1756.67 2170.4,1755.18 2168.91,1753.95 2167.2,1753.05 2165.36,1752.48 2163.44,1752.3 1779.58,1752.3 1777.66,1752.48 1775.81,1753.05 1774.11,1753.95 1772.62,1755.18 1771.4,1756.67 1770.49,1758.37 1769.93,1760.22 1769.74,1762.14 1769.74,1939.3
GND on L1 (TOP) "GND" (solid, remove dead copper, pour order 9): 2547.26,1939.09 2545.34,1939.28 2543.49,1939.84 2541.79,1940.75 2540.3,1941.97 2539.07,1943.46 2538.16,1945.17 2537.6,1947.01 2537.41,1948.93 2537.41,2057.2 2537.6,2059.12 2538.16,2060.97 2539.07,2062.67 2540.3,2064.16 2541.79,2065.38 2543.49,2066.29 2545.34,2066.85 2547.26,2067.04 2960.64,2067.04 2962.56,2066.85 2964.41,2066.29 2966.11,2065.38 2967.6,2064.16 2968.83,2062.67 2969.74,2060.97 2970.3,2059.12 2970.48,2057.2 2970.48,1948.93 2970.3,1947.01 2969.74,1945.17 2968.83,1943.46 2967.6,1941.97 2966.11,1940.75 2964.41,1939.84 2962.56,1939.28 2960.64,1939.09 2960.64,1761.92 2960.45,1760 2959.89,1758.16 2958.98,1756.46 2957.76,1754.97 2956.27,1753.74 2954.57,1752.83 2952.72,1752.27 2950.8,1752.08 2566.94,1752.08 2565.02,1752.27 2563.17,1752.83 2561.47,1753.74 2559.98,1754.97 2558.76,1756.46 2557.85,1758.16 2557.29,1760 2557.1,1761.92 2557.1,1939.09
+1V8 on L3 (PWR) "+1V8" (solid, remove dead copper, pour order 2): 1736.26,753.8 1736.07,751.88 1735.51,750.03 1734.61,748.33 1733.38,746.84 1731.89,745.61 1730.19,744.7 1728.34,744.14 1726.42,743.95 1541.38,743.95 1539.46,744.14 1537.62,744.7 1535.91,745.61 1534.42,746.84 1533.2,748.33 1532.29,750.03 1531.73,751.88 1531.54,753.8 1531.54,978.2 1531.73,980.12 1532.29,981.97 1533.2,983.67 1534.42,985.16 1535.91,986.39 1537.62,987.3 1539.46,987.86 1541.38,988.05 1726.42,988.05 1728.34,987.86 1730.19,987.3 1731.89,986.39 1733.38,985.16 1734.61,983.67 1735.51,981.97 1736.07,980.12 1736.26,978.2
+1V0 on L3 (PWR) "+1V0" (solid, remove dead copper, pour order 7): 2641.78,1147.5 2641.59,1145.58 2641.03,1143.73 2640.12,1142.03 2638.89,1140.54 2637.4,1139.31 2635.7,1138.4 2633.85,1137.84 2631.93,1137.65 2289.41,1137.65 2287.49,1137.84 2285.65,1138.4 2283.95,1139.31 2282.45,1140.54 2281.23,1142.03 2280.32,1143.73 2279.76,1145.58 2279.57,1147.5 2279.57,1450.65 2279.76,1452.57 2280.32,1454.41 2281.23,1456.11 2282.45,1457.61 2283.95,1458.83 2285.65,1459.74 2287.49,1460.3 2289.41,1460.49 2631.93,1460.49 2633.85,1460.3 2635.7,1459.74 2637.4,1458.83 2638.89,1457.61 2640.12,1456.11 2641.03,1454.41 2641.59,1452.57 2641.78,1450.65
+5V_VBUS on L3 (PWR) "+5V_VBUS" (solid, remove dead copper, pour order 10): 350.44,2041.2 350.63,2043.12 351.19,2044.96 352.1,2046.67 353.32,2048.16 354.81,2049.38 356.51,2050.29 358.36,2050.85 360.28,2051.04 781.54,2051.04 783.46,2050.85 785.31,2050.29 787.01,2049.38 788.5,2048.16 789.72,2046.67 790.63,2044.96 791.19,2043.12 791.38,2041.2 791.38,1738.05 791.19,1736.13 790.63,1734.28 789.72,1732.58 788.5,1731.09 787.01,1729.86 785.31,1728.95 783.46,1728.39 781.54,1728.2 360.28,1728.2 358.36,1728.39 356.51,1728.95 354.81,1729.86 353.32,1731.09 352.1,1732.58 351.19,1734.28 350.63,1736.13 350.44,1738.05
+5V_VBUS on L3 (PWR) "+5V_VBUS" (solid, remove dead copper, pour order 11): 2277.6,1893.56 2279.52,1893.37 2281.37,1892.81 2283.07,1891.9 2284.56,1890.68 2285.79,1889.18 2286.7,1887.48 2287.26,1885.64 2287.44,1883.72 2287.44,1580.57 2287.26,1578.65 2286.7,1576.8 2285.79,1575.1 2284.56,1573.61 2283.07,1572.38 2281.37,1571.47 2279.52,1570.91 2277.6,1570.72 1738.23,1570.72 1736.31,1570.91 1734.47,1571.47 1732.76,1572.38 1731.27,1573.61 1730.05,1575.1 1729.14,1576.8 1728.58,1578.65 1728.39,1580.57 1728.39,1883.72 1728.58,1885.64 1729.14,1887.48 1730.05,1889.18 1731.27,1890.68 1732.76,1891.9 1734.47,1892.81 1736.31,1893.37 1738.23,1893.56
+5V_VBUS on L3 (PWR) "+5V_VBUS" (solid, remove dead copper, pour order 12): 2476.42,1883.72 2476.61,1885.64 2477.17,1887.48 2478.08,1889.18 2479.3,1890.68 2480.8,1891.9 2482.5,1892.81 2484.34,1893.37 2486.26,1893.56 3065,1893.56 3066.92,1893.37 3068.77,1892.81 3070.47,1891.9 3071.96,1890.68 3073.19,1889.18 3074.1,1887.48 3074.66,1885.64 3074.85,1883.72 3074.85,1580.57 3074.66,1578.65 3074.1,1576.8 3073.19,1575.1 3071.96,1573.61 3070.47,1572.38 3068.77,1571.47 3066.92,1570.91 3065,1570.72 2486.26,1570.72 2484.34,1570.91 2482.5,1571.47 2480.8,1572.38 2479.3,1573.61 2478.08,1575.1 2477.17,1576.8 2476.61,1578.65 2476.42,1580.57
+1V8 on L3 (PWR) "+1V8" (solid, remove dead copper, pour order 13): 870.12,241.98 869.93,240.06 869.37,238.22 868.46,236.52 867.24,235.02 865.75,233.8 864.05,232.89 862.2,232.33 860.28,232.14 7.92,232.14 6,232.33 4.15,232.89 2.45,233.8 0.96,235.02 -0.27,236.52 -1.18,238.22 -1.74,240.06 -1.93,241.98 -1.92,1371.91 -1.74,1373.83 -1.18,1375.67 -0.27,1377.37 0.96,1378.87 2.45,1380.09 4.15,1381 6,1381.56 7.92,1381.75 860.28,1381.75 862.2,1381.56 864.05,1381 865.75,1380.09 867.24,1378.87 868.46,1377.37 869.37,1375.67 869.93,1373.83 870.12,1371.91
+3V3 on L3 (PWR) "+3V3" (solid, remove dead copper, pour order 15): 201 vertices, not listed, extent -9.8,-9.98 3395.71,2135.69
GND on L2 (GND) "GND" (solid, remove dead copper, pour order 14): 201 vertices, not listed, extent -9.8,-9.98 3395.71,2135.69

## Other copper
L4 (BOTTOM):
  pour cut-out: 314.96,1496.06 1338.58,1496.06 1653.54,1181.1 1653.54,1110.24 1618.11,1110.24 1618.11,1019.69 1562.99,1019.69 1562.99,866.14 1523.62,866.14 1523.62,838.58 1476.38,838.58 1476.38,708.66 1409.45,708.66 1188.98,488.19 299.21,488.19 78.74,708.66 78.74,1259.84

## Silkscreen, mask and mechanical layers (free items; w line width, h text height)
Top Overlay:
  lines w7.87: 744.09,1027.56 755.91,1027.56 744.09,1015.75 744.09,1027.56 ; 744.09,1027.56 783.46,988.19 ; 783.46,988.19 783.46,988.19 ; 783.46,988.19 893.7,988.19 893.7,937.01 956.69,937.01 956.69,826.77 893.7,826.77 893.7,700.79 783.46,700.79 783.46,988.19 ; 1240.16,271.65 1271.65,303.15 1295.28,303.15 ; 1240.16,271.65 1240.16,271.65 ; 1240.16,271.65 858.27,271.65 858.27,62.99 1240.16,62.99 1240.16,271.65 ; 1295.28,303.15 1287.4,295.28 1287.4,311.02 1295.28,303.15 ; 586.61,960.63 586.61,1263.78 712.6,1263.78 712.6,1220.47 783.46,1220.47 783.46,1078.74 712.6,1078.74 712.6,960.63 586.61,960.63 ; 818.9,1590.55 929.13,1590.55 929.13,1692.91 960.63,1692.91 960.63,1818.9 818.9,1818.9 818.9,1708.66 818.9,1590.55 ; 1165.35,488.19 1165.35,590.55 1381.89,590.55 1381.89,433.07 1259.84,433.07 1259.84,488.19 1165.35,488.19 ; 1303.15,55.12 1787.4,55.12 1787.4,338.58 1303.15,338.58 1303.15,55.12 ; 1799.21,1456.69 1799.21,1606.3 2031.5,1606.3 2031.5,1503.94 1925.2,1503.94 1925.2,1456.69 1799.21,1456.69 ; 2244.09,70.87 2244.09,314.96 2354.33,314.96 2354.33,70.87 2244.09,70.87 ; 2354.33,972.44 2492.13,972.44 2492.13,1019.69 2586.61,1019.69 2586.61,1118.11 2354.33,1118.11 2354.33,972.44 ; 3015.75,1330.71 3015.75,1582.68 3299.21,1582.68 3299.21,1330.71 3015.75,1330.71
  text "GND" at 31.5,1748.03 h31.5
  text "USB HOST" at 2263.78,1712.6 h39.37 r90
  text "USB DEVICE" at 2437.01,1681.1 h39.37 r90
  text "CONNECT TO PC" at 2492.13,1669.29 h31.5 r90
  text "JTAG" at 3086.61,1598.43 h31.5
  text "FLASH WP" at 803.15,1582.68 h31.5 r90
  text "3V3" at 31.5,1574.8 h31.5
  text "RST" at 3031.5,1535.43 h31.5
  text "GND" at 3196.85,1535.43 h31.5
  text "128MB NAND FLASH" at 874.02,1507.87 h39.37
  text "TDI" at 3031.5,1488.19 h31.5
  text "NC" at 3196.85,1488.19 h31.5
  text "VDDFUSE" at 1937.01,1460.63 h31.5
  text "TDO" at 3031.5,1440.94 h31.5
  text "GND" at 3196.85,1440.94 h31.5
  text "TCK" at 3031.5,1393.7 h31.5
  text "GND" at 3196.85,1393.7 h31.5
  text "TMS" at 3031.5,1346.46 h31.5
  text "3V3" at 3196.85,1346.46 h31.5
  text "Linux Capable Business Card" at 326.77,1342.52 h118.11
  text "RevA - 2021" at 866.14,1283.46 h59.06
  text "1V0" at 2299.21,1165.35 h31.5
  text "BMS" at 2503.94,976.38 h31.5
  text "256MB DDR2-533" at 204.72,511.81 h39.37
  text "SAM9N12" at 1555.12,496.06 h39.37
  text "JTAGSEL" at 1035.43,440.94 h31.5
  text "1V8" at 811.02,370.08 h31.5
  text "UART / 115200" at 2236.22,338.58 h31.5
  text "TX" at 2291.34,244.09 h31.5 r90
  text "RX" at 2338.58,244.09 h31.5 r90
  text "JLCJLCJLCJLC" at 3066.93,177.17 h35.43 r90
  text "3V3" at 2291.34,86.61 h31.5 r90
  text "GND" at 2338.58,86.61 h31.5 r90
Bottom Overlay:
  drawing of 370 lines, arcs and shapes, not listed
Bottom Solder:
  text "Linux Capable Business Card" at 3010.12,1886.86 h275.59
  text "designed by" at 2062.57,1722.73 h157.48
  text "Manuel Tosone" at 2565.59,1498.48 h275.59
  text "ts.manuel.dev@gmail.com" at 2427.09,305.1 h157.48
  text "Rev A - 2021" at 2420.14,158.86 h118.11
Manufacturing Notes:
  drawing of 283 lines, arcs and shapes, not listed
  text ".ProjectTitle" at -149.61,6174.52 h157.48
  text ".ProjectRevision" at 1409.45,5989.48 h157.48
  text "Board info" at 3937.01,5807.09 h60
  text "Files" at -196.85,5708.66 h60
  text "Minimum Track: 90um(TOP/BOTTOM) 127um(INTERNAL)" at 3937.01,5708.66 h60
  text "*.GTO - Top Overlay" at -196.85,5610.24 h60
  text "Minimum Gap: 90um(TOP/BOTTOM) 127um(INTERNAL)" at 3937.01,5610.24 h60
  text "*.GTP - Top Paste" at -196.85,5511.81 h60
  text "Minimum Through Hole VIA: 0.45mm (pad) / 0.2mm (drill). Drilling: L1-L4" at 3937.01,5511.81 h60
  text "*.GTS - Top Solder" at -196.85,5413.39 h60
  text "*.GTL - L1 (TOP)" at -196.85,5314.96 h60
  text "*.G1  - L2 (GND)" at -196.85,5216.54 h60
  text "1. THIS BOARD CONTAINS IMPEDANCE CONTROLLED TRACKS, TRACK AND GAP SIZES ARE AS FOLLOWS:" at 3937.01,5216.54 h60
  text "*.G2  - L3 (PWR)" at -196.85,5118.11 h60
  text "*.GBL - L4 (BOTTOM)" at -196.85,5019.68 h60
  text "TYPE;" at 4133.86,5019.69 h60
  text "Impedance;" at 4625.98,5019.69 h60
  text "Layer (Reference);" at 5511.81,5019.69 h60
  text "Width (um);" at 6889.76,5019.69 h60
  text "Gap (um);" at 7677.17,5019.69 h60
  text "*.GBS - Bottom Solder" at -196.85,4921.26 h60
  text "*.GBP - Bottom Paste" at -196.85,4822.83 h60
  text "SE;" at 4133.86,4822.83 h60
  text "55ohm;" at 4625.98,4822.83 h60
  text "L1(L2), L4(L3);" at 5511.81,4822.83 h60
  text "120" at 6889.76,4822.83 h60
  text "*.GBO - Bottom Overlay" at -196.85,4724.41 h60
  text "*.GM3 - Manufacturing Notes" at -196.85,4625.98 h60
  text "DIFF;" at 4133.86,4625.98 h60
  text "90ohm;" at 4625.98,4625.98 h60
  text "L1(L2), L4(L3);" at 5511.81,4625.98 h60
  text "141" at 6889.76,4625.98 h60
  text "152" at 7677.17,4625.98 h60
  text "*.GM4 - Mechanical Drawing" at -196.85,4527.56 h60
  text "*.GM5 - Board Outline" at -196.85,4429.13 h60
  text "DIFF;" at 4133.86,4429.13 h60
  text "100ohm;" at 4625.98,4429.13 h60
  text "L1(L2), L4(L3);" at 5511.81,4429.13 h60
  text "110" at 6889.76,4429.13 h60
  text "152" at 7677.17,4429.13 h60
  text "Layer" at -168.26,4170.01 h45.92
  text "Name" at 150.13,4170.01 h45.92
  text "Thickness" at 866.35,4170.01 h45.92
  text "Constant" at 1368.35,4170.01 h45.92
  text "Board Layer Stack" at 1809.15,4170.01 h45.92
  text "Top Overlay" at 150.13,4078.17 h45.92
  text "2. FINISHED PANEL THICKNESS IS NOT CRITICAL: TO BE APPROXIMATELY 1mm" at 3937.01,4035.43 h60
  text "Top Solder" at 150.13,3986.34 h45.92
  text "0.020mm" at 866.35,3986.34 h45.92
  text "3.8" at 1368.35,3986.34 h45.92
  text "1" at -72.63,3894.5 h45.92
  text "L1 (TOP)" at 150.13,3894.5 h45.92
  text "0.035mm" at 866.35,3894.5 h45.92
  text "Dielectric 2" at 150.13,3802.67 h45.92
  text "0.100mm" at 866.35,3802.67 h45.92
  text "4.05" at 1368.35,3802.67 h45.92
  text "3. BOARD FINISH: IMMERSION Au/ELECTROLESS Ni; 0.05-0.12 um GOLD; 3-6um NICKEL" at 3937.01,3740.16 h60
  text "2" at -80.28,3710.83 h45.92
  text "L2 (GND)" at 150.13,3710.83 h45.92
  text "0.018mm" at 866.35,3710.83 h45.92
  text "Dielectric 1" at 150.13,3619 h45.92
  text "0.665mm" at 866.35,3619 h45.92
  text "4.5" at 1368.35,3619 h45.92
  text "3" at -80.28,3527.17 h45.92
  text "L3 (PWR)" at 150.13,3527.17 h45.92
  text "0.018mm" at 866.35,3527.17 h45.92
  text "4. SOLDER RESIST: APPLY TO BOTH SIDES COLOUR - GREEN" at 3937.01,3444.88 h60
  text "Dielectric 3" at 150.13,3435.33 h45.92
  text "0.100mm" at 866.35,3435.33 h45.92
  text "4.05" at 1368.35,3435.33 h45.92
  text "4" at -80.28,3343.5 h45.92
  text "L4 (BOTTOM)" at 150.13,3343.5 h45.92
  text "0.035mm" at 866.35,3343.5 h45.92
  text "Bottom Solder" at 150.13,3251.66 h45.92
  text "0.020mm" at 866.35,3251.66 h45.92
  text "3.8" at 1368.35,3251.66 h45.92
  text "Bottom Overlay" at 150.13,3159.83 h45.92
  text "5. COMPONENT IDENT: COLOUR TO BE WHITE" at 3937.01,3149.61 h60
  text "Total board thickness:" at -168.26,3068 h45.92
  text "1.011mm" at 866.35,3068 h45.92
Mechanical Drawing:
  circle w19.68: c3188.98,1929.13 r98.43
  lines w7.87: 3149.61,1929.13 3228.35,1929.13 ; 3188.98,1889.76 3188.98,1968.5
  lines w19.68: 0,118.11 ccw(c118.11,118.11) 118.11,0 3267.72,0 ccw(c3267.72,118.11) 3385.83,118.11 3385.83,2007.87 ccw(c3267.72,2007.87) 3267.72,2125.98 118.11,2125.98 ccw(c118.11,2007.87) 0,2007.87 0,118.11
  text ".ProjectTitle" at -444.88,2631.22 h157.48
  text ".ProjectRevision" at 1114.17,2446.18 h157.48
Board Outline:
  the board outline again, w19.68
Top Assembly:
  text ".ProjectTitle" at -444.88,2631.22 h157.48
  text ".ProjectRevision" at 1114.17,2446.18 h157.48
Bottom Assembly:
  text ".ProjectTitle" at 3708.66,2643.03 h157.48
  text ".ProjectRevision" at 1838.58,2446.18 h157.48

## Dimensions
0,118.11 to 3385.83,118.11 on Mechanical Drawing
118.11,2125.98 to 118.11,0 on Mechanical Drawing
3188.98,1929.13 to 3267.72,2007.87 on Mechanical Drawing
118.11,2007.87 to -236.22,2283.46 on Mechanical Drawing
3149.61,1929.13 to 3267.72,2125.98 on Mechanical Drawing
3188.98,1889.76 to 3385.83,2007.87 on Mechanical Drawing

## Text inside footprints (layer, text, board x,y; h text height)
J1: Top Assembly "CONNECTOR SIDE" at 2889.81,2102.22 h19.68 r180
J3: Top Assembly "CONNECTOR SIDE" at 2102.41,2102.22 h19.68 r180